# Altium PCB Fliptris_PCB.PcbDoc
Units mil, origin at the board's own origin, x right, y up, seen from the top; angles counter-clockwise.
Board outline 3170 x 3915 mil, 2 copper layers (Top Layer, Bottom Layer); 53 components, 58 nets, 228 pads, 41 vias.
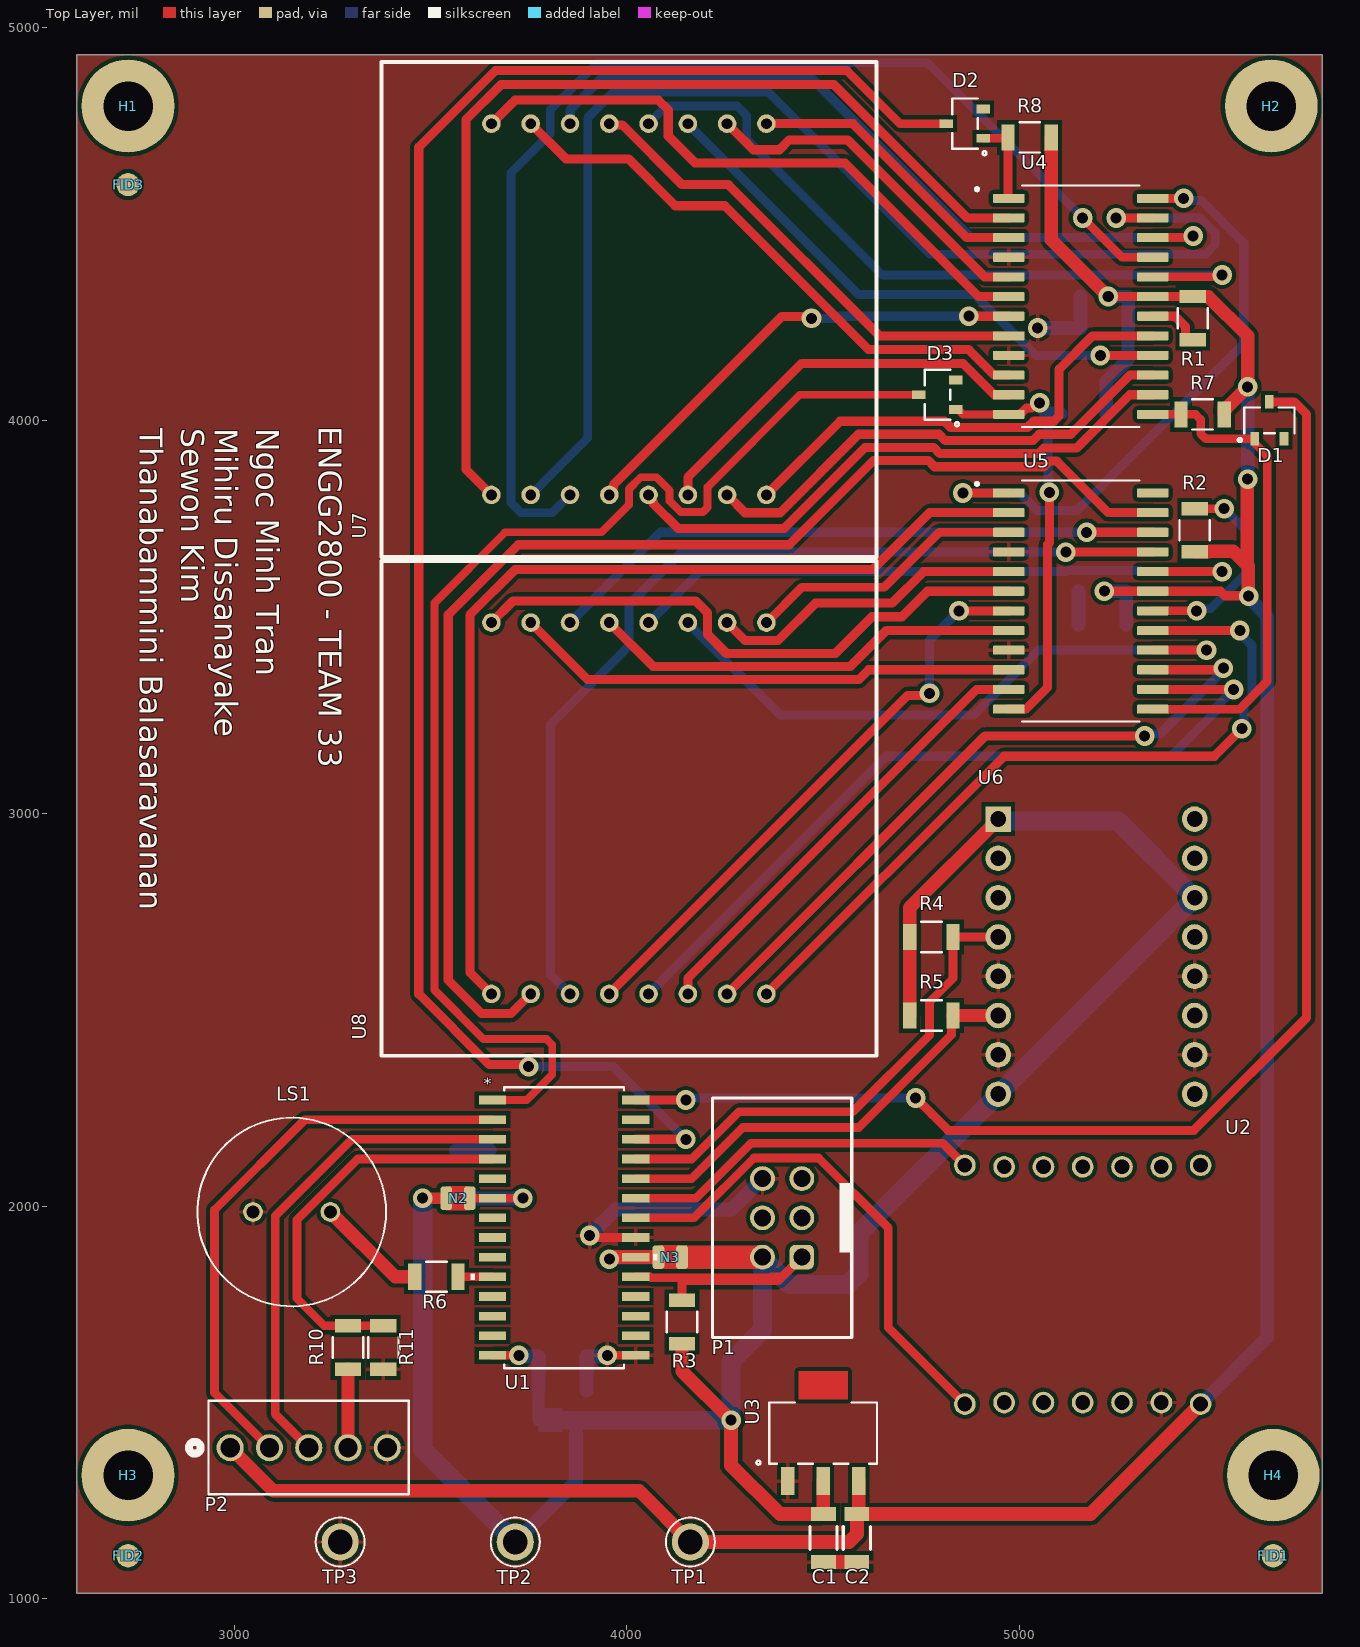
[diagram p0: Top Layer view]
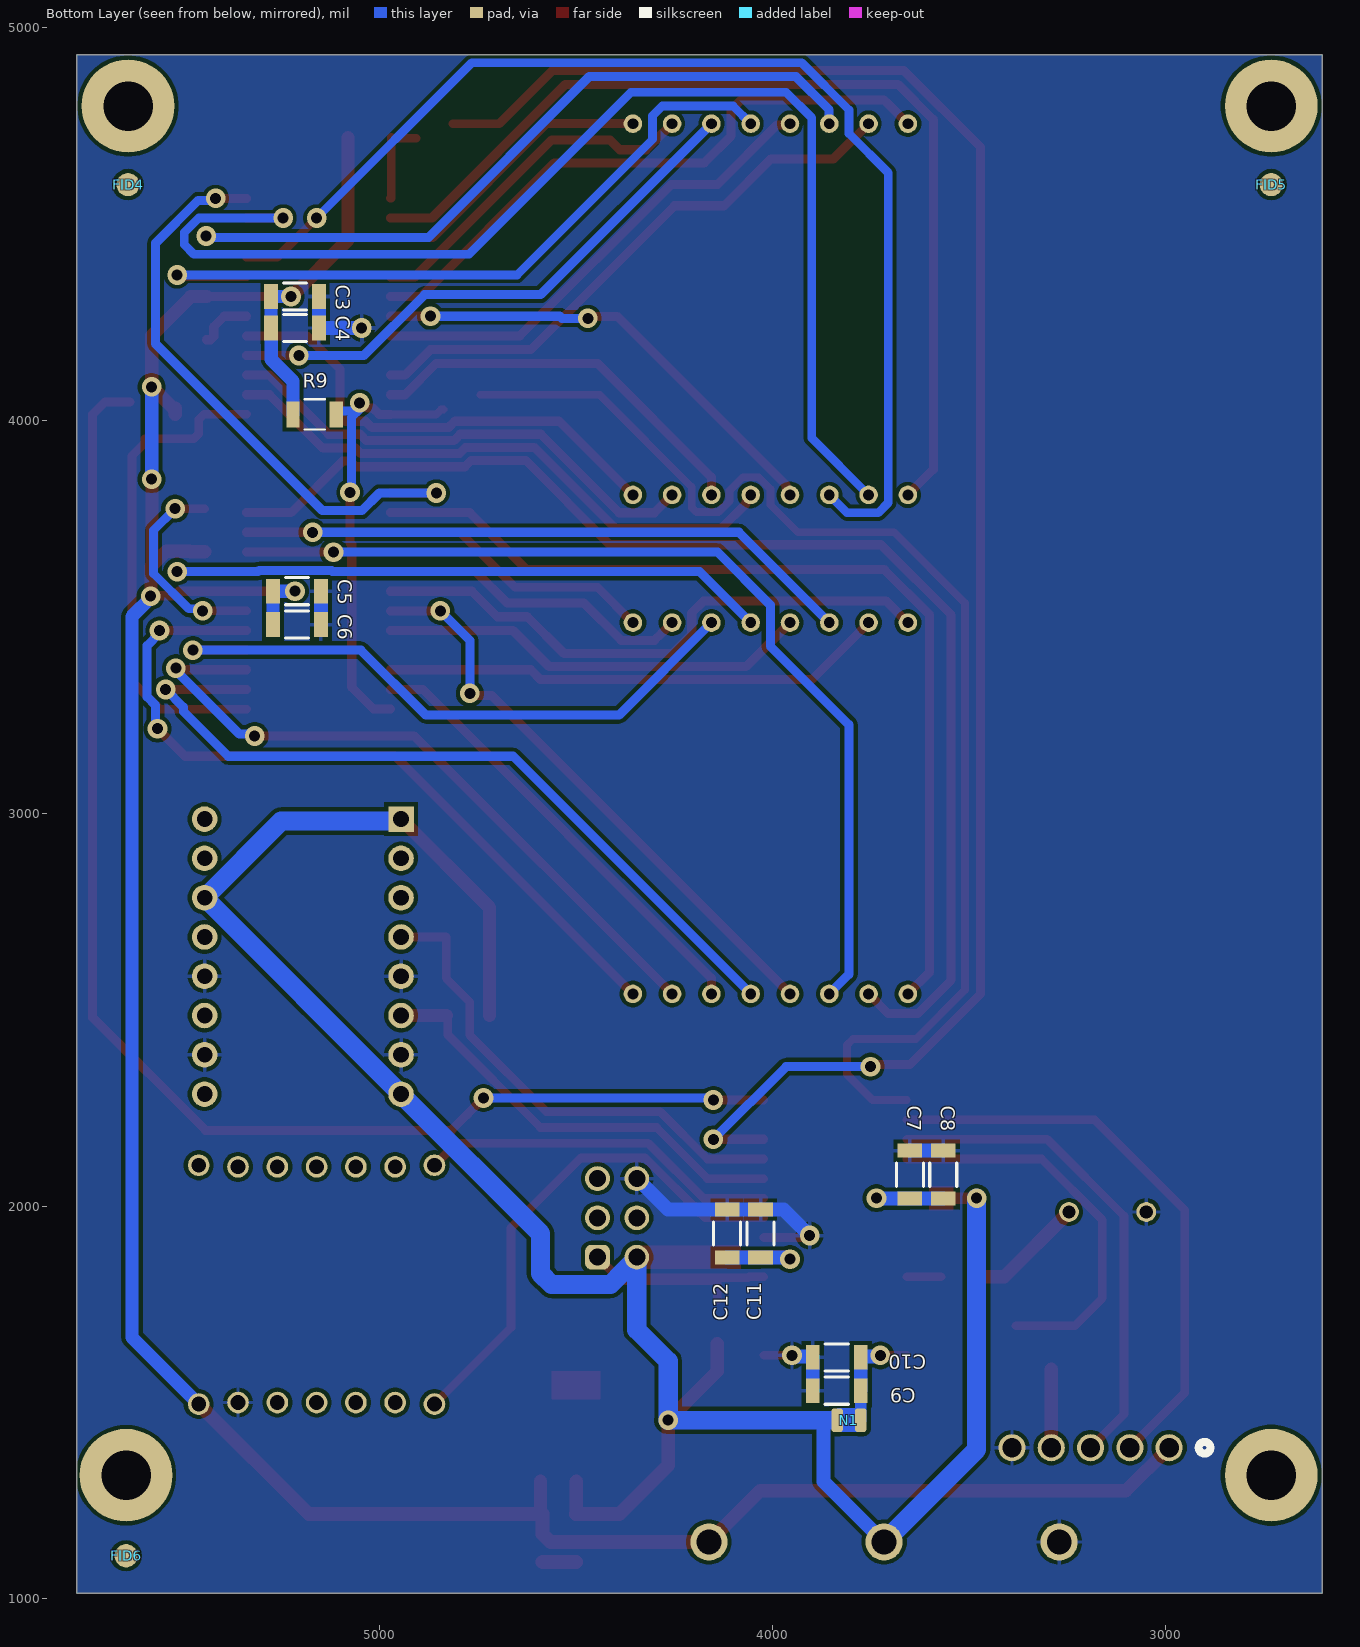
[diagram p1: Bottom Layer view, seen from below]
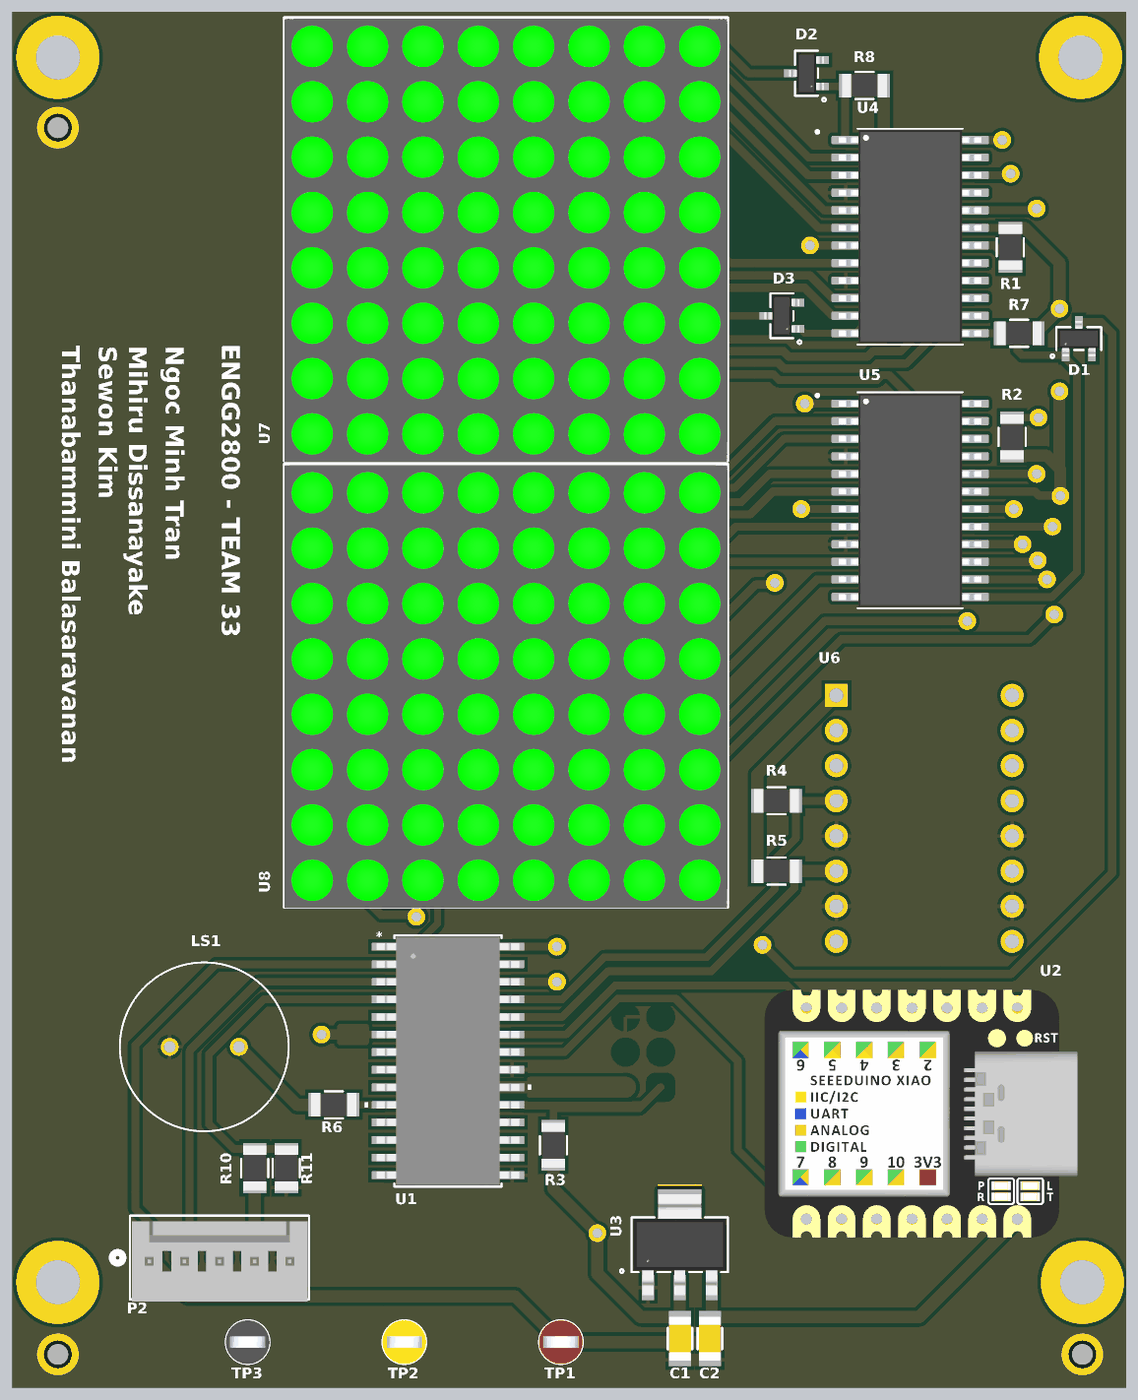
[diagram p2: 3D render of the assembled board from above, using the file's embedded part models]
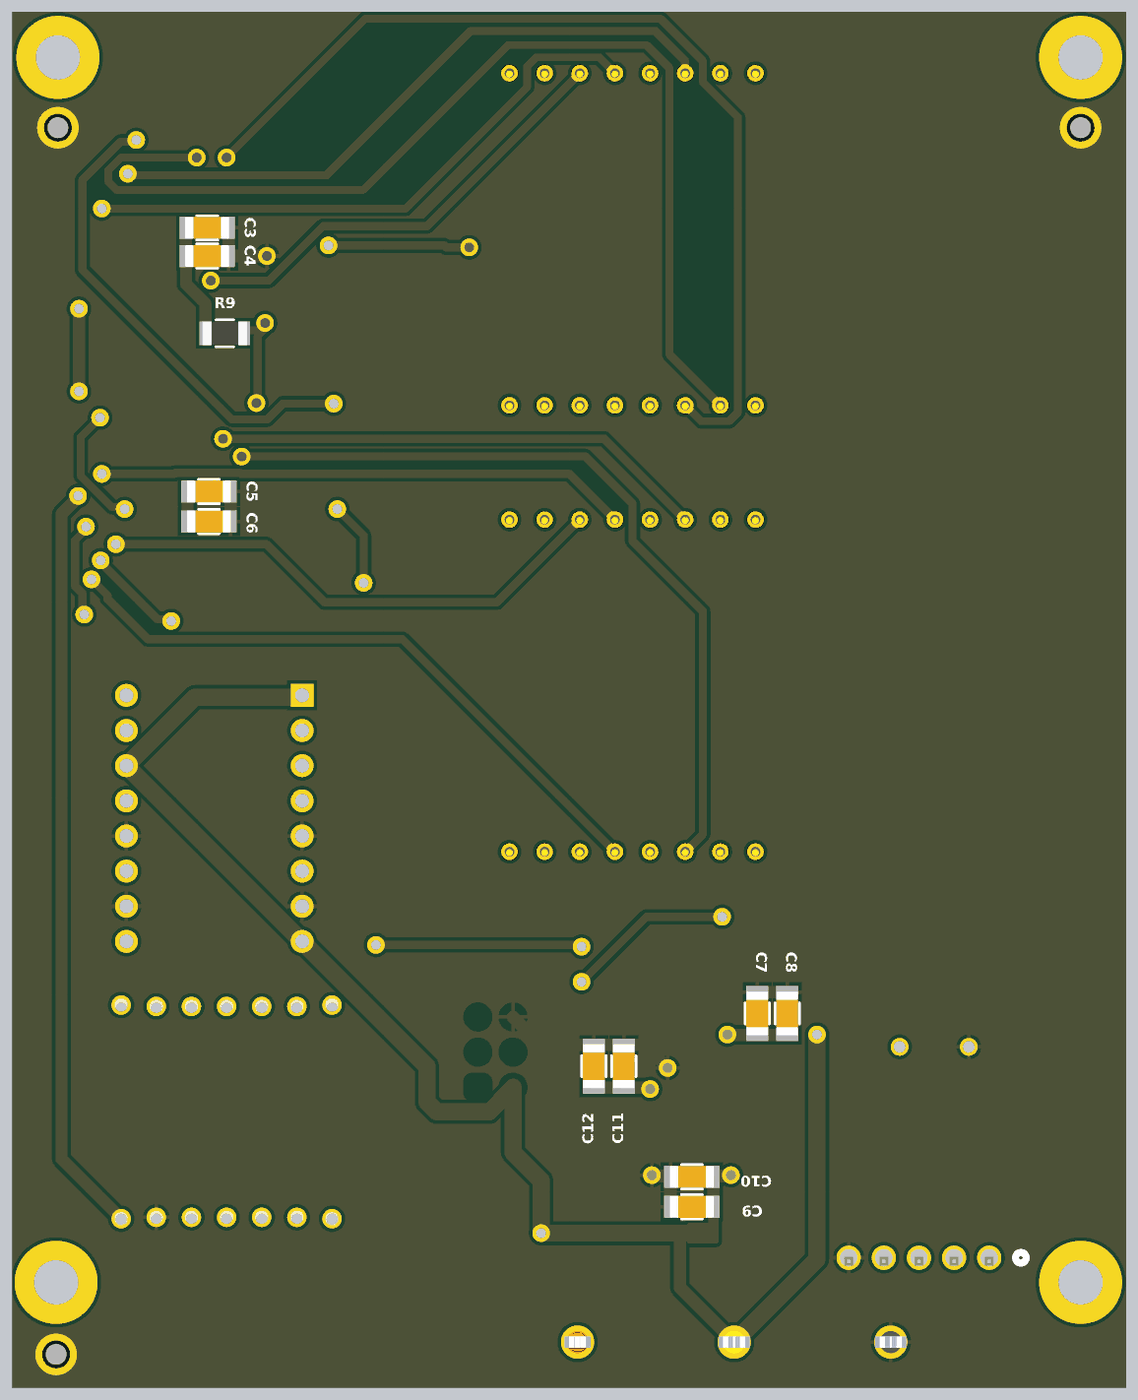
[diagram p3: 3D render of the assembled board from below, using the file's embedded part models]

## Layer stack, top to bottom
Top Solder: solder mask 0.4, Solder Resist, Dk 3.5
Top Layer: signal copper 1.4
Dielectric 1: dielectric 12.6, FR-4, Dk 4.8
Bottom Layer: signal copper 1.4
Bottom Solder: solder mask 0.4, Solder Resist, Dk 3.5

## Board outline
2600,1015 2600,4930 5770,4930 5770,1015

## Design rules (kind name [scope] priority, off if disabled: settings)
Clearance [All] p1: gap=10 ignorepadtopadclearanceinfootprint=FALSE
ComponentClearance [Name = 'LS1' vs (Name = 'FID2') OR (Name = 'HW3')] p1: gap=0 collisioncheckmode=3 verticalgap=0 showdistances=FALSE donotcheckwithout3dbody=TRUE
HoleSize [All] p1: absolutevalues=TRUE maxlimit=500 minlimit=1 maxpercent=80.000 minpercent=20.000
HoleToHoleClearance [All] p1: gap=20 allowstackedmicrovias=TRUE
MinimumSolderMaskSliver [All] p1: minsoldermaskwidth=7
PolygonConnect [All] p1: connectstyle=Relief reliefconductorwidth=10 reliefentries=4 polygonreliefangle="90 Angle" airgapwidth=10
RoutingVias [All] p1: holewidth=28 width=50 viastyle="Through Hole" minholewidth=28 minwidth=50 maxholewidth=28 maxwidth=50
SilkToSilkClearance [All] p1: silktosilkclearance=5
SilkToSolderMaskClearance [IsPad] p1: minsilkscreentomaskgap=6 clearancetoexposedcopper=TRUE
SolderMaskExpansion [All] p1: expansion=0 istentingtop=FALSE
SupplyNets "Schematic Supply Nets_2" [InNet('+5')] p1: voltage=0.000
SupplyNets "Schematic Supply Nets_1" [InNet('GND')] p2: voltage=0.000
SupplyNets "Schematic Supply Nets" [InNet('+3.3V')] p3: voltage=0.000
Width [All] p1: maxlimit=1000 minlimit=99999 preferedwidth=20 toplayer_minwidth=0 bottomlayer_minwidth=0 minimp=50.000000 maximp=50.000000 favimp=50.000000
24 further rules are at their usual default settings.

## Components (designator, comment, footprint, x,y, rotation, side; value= is the part's Value field where it differs from the comment)
C1 "25V X7R 10% 1206" WCAP-CSGP_1206_L3.2W1.6H0.8 4500,1155 r270 top value=10uF
C2 "25V X7R 10% 1206" WCAP-CSGP_1206_L3.2W1.6H0.8 4585,1155 r270 top value=10uF
C3 "10V X7R 10% 1206" WCAP-CSGP_1206_L3.2W1.6H0.8 5215,4315 r180 bottom value=0.1uF
C4 "25V X7R 10% 1206" WCAP-CSGP_1206_L3.2W1.6H0.8 5215,4235 r180 bottom value=10uF
C5 "10V X7R 10% 1206" WCAP-CSGP_1206_L3.2W1.6H0.8 5210,3565 r180 bottom value=0.1uF
C6 "25V X7R 10% 1206" WCAP-CSGP_1206_L3.2W1.6H0.8 5210,3480 r180 bottom value=10uF
C7 "10V X7R 10% 1206" WCAP-CSGP_1206_L3.2W1.6H0.8 3650,2080 r90 bottom value=1uF
C8 "10V X7R 10% 1206" WCAP-CSGP_1206_L3.2W1.6H0.8 3565,2080 r90 bottom value=0.1uF
C9 "10V X7R 10% 1206" WCAP-CSGP_1206_L3.2W1.6H0.8 3836.02,1530 r0 bottom value=1uF
C10 "10V X7R 10% 1206" WCAP-CSGP_1206_L3.2W1.6H0.8 3836.02,1615 r0 bottom value=0.1uF
C11 "10V X7R 10% 1206" WCAP-CSGP_1206_L3.2W1.6H0.8 4030,1930 r90 bottom value=1uF
C12 "10V X7R 10% 1206" WCAP-CSGP_1206_L3.2W1.6H0.8 4115,1930 r90 bottom value=0.1uF
D1 "BAT5404E6327HTSA1" SOT23_INF 5635,4000 r0 top
D2 "BAT5404E6327HTSA1" SOT23_INF 4860,4755 r90 top
D3 "BAT5404E6327HTSA1" SOT23_INF 4790,4065 r90 top
FID1 "FIDUCIAL" FIDUCIAL_1.5MM 5645,1110 r90 top
FID2 "FIDUCIAL" FIDUCIAL_1.5MM 2730,1110 r90 top
FID3 "FIDUCIAL" FIDUCIAL_1.5MM 2730,4600 r90 top
FID4 "FIDUCIAL" FIDUCIAL_1.5MM 5640,4600 r90 bottom
FID5 "FIDUCIAL" FIDUCIAL_1.5MM 2730,4600 r90 bottom
FID6 "FIDUCIAL" FIDUCIAL_1.5MM 5645,1110 r90 bottom
H1 "M3_HOLE" M3_MOUNTING_HOLE 2730,4800 r0 top
H2 "M3_HOLE" M3_MOUNTING_HOLE 5640,4800 r0 top
H3 "M3_HOLE" M3_MOUNTING_HOLE 2730,1315 r0 top
H4 "M3_HOLE" M3_MOUNTING_HOLE 5645,1315 r0 top
LS1 "PS1240P02BT" XDCR_PS1240P02BT 3146.57,1985 r180 top
N1 "NET_TIE" NET_TIE 3835,1455 r180 bottom net-tie
N2 "NET_TIE" NET_TIE 3540,2020 r0 top net-tie
N3 "NET_TIE" NET_TIE 4140,1870 r180 top net-tie
P1 "61200621621" 61200621621 -45605,51970 r90 top
P2 "22272051" CONN_AE-6410-05A_MOL 2990,1385 r180 top
R1 "1% 1/4W 1206" "Universal resistor SMD" 5440,4260 r90 top value=22K
R2 "1% 1/4W 1206" "Universal resistor SMD" 5445,3720 r270 top value=22K
R3 "1% 1/4W 1206" "UNIVERSAL RESISTOR SMD" 4140,1705 r90 top value=1K
R4 "1% 1/4W 1206" "Universal resistor SMD" 4775,2685 r0 top value=4.7K
R5 "1% 1/4W 1206" "Universal resistor SMD" 4775,2485 r0 top value=4.7K
R6 "1% 1/4W 1206" "Universal resistor SMD" 3515,1820 r0 top value=330R
R7 "1% 1/4W 1206" "Universal resistor SMD" 5465,4015 r180 top value=10K
R8 "1% 1/4W 1206" "Universal resistor SMD" 5025,4720 r180 top value=10K
R9 "1% 1/4W 1206" "Universal resistor SMD" 5165,4015 r180 bottom value=10K
R10 "1% 1/4W 1206" "Universal resistor SMD" 3290,1640 r90 top value=4.7K
R11 "1% 1/4W 1206" "Universal resistor SMD" 3380,1640 r90 top value=10K
TP1 "5010" TP_5010 4161.37,1145 r0 top
TP2 "5014" TP_5014 3715.68,1145 r0 top
TP3 "5011" TP_5011 3270,1145 r0 top
U1 "AVR128DB28-I/SO" SOIC28_SO_MCH 3840,1945 r0 top
U2 "XIAO SAMD21" XIAO-14P-ADD-ON 5160,1800 r0 top value=XIAO-Add-On
U3 "LM1117MPX-33NOPB" SOT223-318H_OSI 4499.45,1422 r0 top
U4 "MAX7219CWG+T" SOIC127P1032X265-24N 5155,4290 r0 top
U5 "MAX7219CWG+T" SOIC127P1032X265-24N 5155,3540 r0 top
U6 "LIS3DH" LIS3DH 4945,2985 r0 top
U7 "8x8LED_MATRIX" 8x8LED_MATRIX 4355,4755 r180 top
U8 "8x8LED_MATRIX" 8x8LED_MATRIX 4355,3485 r180 top

## Footprints (in the part's own frame and the unit in brackets; to place one, negate y for a bottom-side part, rotate by r counter-clockwise, add the part's x,y. Pads: shape width x height; smd on the part's side, far side on the other; paste and mask are expansions set on the pad)
8x8LED_MATRIX [mil]
  round 47.2 hole 27.6 paste-99999 mask+2: 1(0,0) 2(100,0) 3(200,0) 4(300,0) 5(400,0) 6(500,0) 7(600,0) 8(700,0) 9(700,944.9) 10(600,944.9) 11(500,944.9) 12(400,944.9) 13(300,944.9) 14(200,944.9) 15(100,944.9) 16(0,944.9)
  silkscreen extent -280,-157 980,1102, body extent -280,-155 980,1105, height 277
61200621621 [mm] "6 pins, straight, gold plating"
  rrect50% 1.6x1.6 hole 1.1: 1(-1272.54,-1271.27)
  round 1.6 hole 1.1: 2(-1272.54,-1268.73) 3(-1270,-1271.27) 4(-1270,-1268.73) 5(-1267.46,-1271.27) 6(-1267.46,-1268.73)
  silkscreen extent -1277.74,-1274.5 -1262.26,-1265.5, body extent -1277.64,-1274.43 -1262.36,-1265.25, height 9.13
CONN_AE-6410-05A_MOL [mil]
  round 69 / inner round 60 / far side round 69 hole 49 paste-99999 mask+0: 1(0,0) 2(-100,0) 3(-200,0) 4(-300,0) 5(-400,0)
  silkscreen extent -455,-120 105,118, body extent -450,-103 50,125, height 463
FIDUCIAL_1.5MM [mm]
  round 1.5 smd paste+0 mask+0.75: 2(0,0)
LIS3DH [mil]
  rect 65x65 hole 40: 1(0,0)
  round 65 hole 40: 2(0,-100) 3(0,-200) 4(0,-300) 5(0,-400) 6(0,-500) 7(0,-600) 8(0,-700) 9(500,-700) 10(500,-600) 11(500,-500) 12(500,-400) 13(500,-300) 14(500,-200) 15(500,-100) 16(500,0)
  body extent -56,-747 550,61, height 63
M3_MOUNTING_HOLE [mm]
  round 6 hole 3.2: 1(0,0)
NET_TIE [mil]
  rrect50% 30x60 smd paste-30 mask+0: N1(0,0) N2(60,0)
  Top Layer region: 0,30 60,30 60,-30 0,-30
SOIC28_SO_MCH [mil]
  rect 69.5x22 smd paste+0 mask+0: 1(-182.25,325) 2(-182.25,275) 3(-182.25,225) 4(-182.25,175) 5(-182.25,125) 6(-182.25,75) 7(-182.25,25) 8(-182.25,-25) 9(-182.25,-75) 10(-182.25,-125) 11(-182.25,-175) 12(-182.25,-225) 13(-182.25,-275) 14(-182.25,-325) 15(182.25,-325) 16(182.25,-275) 17(182.25,-225) 18(182.25,-175) 19(182.25,-125) 20(182.25,-75) 21(182.25,-25) 22(182.25,25) 23(182.25,75) 24(182.25,125) 25(182.25,175) 26(182.25,225) 27(182.25,275) 28(182.25,325)
  silkscreen extent -237,-358 237,358, body extent -203,-353 203,353, height 104
SOIC127P1032X265-24N [mm]
  rrect25% 2.05x0.59 smd: 1(-4.655,6.985) 2(-4.655,5.715) 3(-4.655,4.445) 4(-4.655,3.175) 5(-4.655,1.905) 6(-4.655,0.635) 7(-4.655,-0.635) 8(-4.655,-1.905) 9(-4.655,-3.175) 10(-4.655,-4.445) 11(-4.655,-5.715) 12(-4.655,-6.985) 13(4.655,-6.985) 14(4.655,-5.715) 15(4.655,-4.445) 16(4.655,-3.175) 17(4.655,-1.905) 18(4.655,-0.635) 19(4.655,0.635) 20(4.655,1.905) 21(4.655,3.175) 22(4.655,4.445) 23(4.655,5.715) 24(4.655,6.985)
  silkscreen extent -6.8,-7.8 3.8,7.8, body extent -5.16,-7.7 5.16,7.7, height 2.65
SOT23_INF [mil]
  rect 22x34 smd paste+0 mask+0: 1(-37.5,-47) 2(37.5,-47) 3(0,47)
  silkscreen extent -80,-55 64,32, body extent -59,-50 59,50, height 43
SOT223-318H_OSI [mil]
  rect 34x71 smd paste+0 mask+0: 1(-90.55,-122) 2(0,-122) 3(90.55,-122)
  Top Layer region: 62,86.5 62,157.5 -62,157.5 -62,86.5
  silkscreen extent -170,-80 137,78, body extent -132,-144 132,144, height 71
TP_5010 [mm]
  round 2.4 hole 1.6: TP(0,0)
  silkscreen extent -1.59,-1.58 1.59,1.58, body extent -1.59,-1.59 1.59,1.59, height 8.13
TP_5011 [mm]
  round 2.4 hole 1.6: TP(0,0)
  silkscreen extent -1.59,-1.58 1.59,1.58, body extent -1.59,-1.59 1.59,1.59, height 8.13
TP_5014 [mm]
  round 2.4 hole 1.6: TP(0,0)
  silkscreen extent -1.59,-1.58 1.59,1.58, body extent -1.59,-1.59 1.59,1.59, height 8.13
"Universal resistor SMD" [mil]
  rect 34x67 smd paste+0 mask+0: 1(-55,0) 2(55,0)
  silkscreen extent -26,-38 26,38, body extent -64,-34 64,34, height 26
"UNIVERSAL RESISTOR SMD" [mil]
  rect 34x67 smd paste+0 mask+0: 1(-55,0) 2(55,0)
  silkscreen extent -26,-38 26,38, body extent -64,-34 64,34, height 26
WCAP-CSGP_1206_L3.2W1.6H0.8 [mm] "Ceramic Capacitors, body 3.2x1.6mm"
  rect 0.9x1.6 smd: 1(-1.55,0) 2(1.55,0)
  silkscreen extent -0.75,-0.87 0.75,0.87, body extent -1.6,-0.8 1.6,0.8, height 0.8
XDCR_PS1240P02BT [mm]
  round 1.28 hole 0.85: 1(-2.5,0) 2(2.5,0)
  silkscreen extent -6.1,-6.1 6.1,6.1
XIAO-14P-ADD-ON [mm]
  round 1.4 hole 0.95: 1(7.62,7.72) 2(5.08,7.62) 3(2.54,7.62) 4(0,7.62) 5(-2.54,7.62) 6(-5.08,7.62) 7(-7.62,7.72) 8(-7.62,-7.72) 9(-5.08,-7.62) 10(-2.54,-7.62) 11(0,-7.62) 12(2.54,-7.62) 13(5.08,-7.62) 14(7.62,-7.72)
  body extent -10.65,-9.08 11.95,8.82, height 4.5

## Part data
C1 C2 C4 C6: library part CMP-03913-65419883-2, "Cap Ceramic uF 10V X7R 10% Pad SMD 1206", Case/Package=1206
C3 C5 C8 C10 C12: library part CMP-03913-65419883-2, "Cap Ceramic 0.1uF 10V X7R 10% Pad SMD 1206", Case/Package=1206, Manufacturer="Würth Elektronik", Manufacturer Product Number=885012208009
C7 C9 C11: library part CMP-03913-65419883-2, "Cap Ceramic 1uF 10V X7R 10% Pad SMD 1206", Case/Package=1206, Manufacturer="Würth Elektronik", Manufacturer Product Number=885012208013
D1 D2 D3: "Silicon Schottky Diode", Manufacturer_Name=Infineon, Copyright="Copyright (C) 2025 Ultra Librarian. All rights reserved.", Manufacturer_Part_Number=BAT5404E6327HTSA1, RefDes=RefDes, Type="Diodes - Rectifiers, Arrays"
LS1: "Buzzers Transducer, Externally Driven Piezo 3V 4kHz 60dB @ 3V, 10cm Through Hole PC Pins", Package="2020 TDK", Availability=Unavailable, MF=TDK, MP=PS1240P02BT, Price=None, SnapEDA_Link=https://www.snapeda.com/parts/PS1240P02BT/TDK/view-part/53420/?ref=snap
P1: library part CMP-1502-00000-3, "Conn Shrouded Header (4 Sides) M 6 POS 2.54mm Solder ST Top Entry Thru-Hole Tray", Color=Black, Contact Resistance=20mΩ, Current Rating=3A, Insulation Resistance=1GΩ, Max Operating Temperature=105°C, Min Operating Temperature=-40°C, Operating Supply Voltage=250V, Connector Type="Male Pin", Contact Material=Copper, Contact Plating=Gold, Gender=Male, Insulation Material=PBT, Lead Pitch=2.54mm, Length=15.28mm, Mount="Through Hole", Number of Contacts=6, Number of Pins=6, Number of Positions=6, Number of Rows=2, Orientation=Vertical, Pitch=2.54mm, RoHS=Compliant, Row Spacing=2.54mm, Termination=Solder
P2: "KK 254 Wire-to-Board Header, Vertical, with Friction Lock, 5 Circuits, Tin (Sn) Plating", Manufacturer_Name="Molex Connector Corporation", Copyright="Copyright (C) 2025 Ultra Librarian. All rights reserved.", Manufacturer_Part_Number=22272051, RefDes=RefDes, Type=Type
R1 R2 R3 R4 R5 R6 R7 R8 R9 R10 R11: library part "Universal resistor SMD", "Resistor SMD 1206", Case/Package=1206
TP1: "Test Point MultiPurpose THM .445 L .125 OD Heat Resistant Nylon 46 Red", Package="NON STANDARD-1 Keystone", Check_prices=https://www.snapeda.com/parts/5010/Keystone/view-part/?ref=eda, MF="Keystone Electronics", MP=5010, SnapEDA_Link=https://www.snapeda.com/parts/5010/Keystone/view-part/?ref=snap
TP2: "Test Point MultiPurpose THM H .445 Nylon 46 Insulated Yel PhosBronze/Silver", Package=None, Check_prices=https://www.snapeda.com/parts/5014/Keystone/view-part/?ref=eda, MF=Keystone, MP=5014, SnapEDA_Link=https://www.snapeda.com/parts/5014/Keystone/view-part/?ref=snap
TP3: "Test Point MultiPurpose THM H .445 Nylon 46 Insulated Blk PhosBronze/Silver", Package=None, Check_prices=https://www.snapeda.com/parts/5011/Keystone/view-part/?ref=eda, MF="Keystone Electronics Corp.", MP=5011, SnapEDA_Link=https://www.snapeda.com/parts/5011/Keystone/view-part/?ref=snap
U1: library part AVR128DB28-ISO, "No Description Available", Manufacturer_Name=Microchip, Copyright="Copyright (C) 2026 Ultra Librarian. All rights reserved.", Manufacturer_Part_Number=AVR128DB28-I/SO, RefDes=RefDes, Type=Type
U2: library part XIAO-Add-On
U3: "Description", Manufacturer_Name=onsemi, Copyright="Copyright (C) 2025 Ultra Librarian. All rights reserved.", Manufacturer_Part_Number=LM1117MPX-33NOPB, RefDes=RefDes, Type=Type
U4 U5: "LED Driver 64 Segment 330000uA Supply Current 24-Pin SOIC W T/R", Package=None, Check_prices=https://www.snapeda.com/parts/MAX7219CWG+T/Maxim+Integrated/view-part/?ref=eda, MF="Maxim Integrated Products", MP=MAX7219CWG+T, SnapEDA_Link=https://www.snapeda.com/parts/MAX7219CWG+T/Maxim+Integrated/view-part/?ref=snap

## Via types
v1: diameter 50, hole 28, Top Layer to Bottom Layer, 41 vias

## Nets (pads, with @x,y where several pads share a name; then routed paths per layer and width w, separated by ;. In a path a pad name is that pad's centre, name@x,y a point inside that pad or via, vN(x,y) a via of type N, cw(c..) or ccw(c..) an arc to the next point about the centre after c; other vN are vias at no path point)
5V_CLK: D1.1 R7.2 U4.13 U5.13 | length 1258
  Top Layer w22: U5.13 5559.4,3265 5630,3335.6 5630,3910 5597.5,3942.5 D1.1 5472.89,3953 5460,3965.89 5460,4002.11 5447.11,4015 R7.2 U4.13
5V_LOAD: D3.1 R9.2 U4.12 U5.12 | length 1155.3
  Top Layer w20: D3.1 4843,4027.5 4855.5,4015 U4.12
  Top Layer w23.23: U5.12 5015,3265 5070.5,3320.5 5070.5,3683.74 5075,3688.24 v1(5075,3816.61) ; U4.12 5000.47,4015 5016.47,4031 5029.79,4031 5043.17,4044.39 v1(5050.42,4044.39)
  Bottom Layer w23.23: v1(5050.42,4044.39) v1@5050.42,4028.46 ; v1(5075,3816.61) 5071.39,3820.23 5071.39,4007.49 v1@5050.42,4028.46 ; R9.2 5110,4017.96 5104.61,4023.34 5055.54,4023.34 v1@5050.42,4028.46
5V_MOSI: D2.1 R8.2 U4.1 | length 220.4
  Top Layer w22: D2.1 4967.5,4717.5 R8.2 4970,4565.61 4970.61,4565 U4.1
+3.3V: C1.1 N1.N1 N2.N1 N3.N1 P1.2 R3.1 R4.1 R5.1 TP2.TP U3.2 U6.1 U6.8 U6.14 | length 5983.2
  Top Layer w30: v1(3480,2020) N2.N1
  Top Layer w34: R3.1 4140,1580 v1(4265,1455) ; C1.1@4499.45,1216.57 U3.2 ; R5.1 R4.1 4720,2760 U6.1@4947.35,2987.35
  Top Layer w35.43: v1(4265,1455) 4265,1340 4388.98,1216.02 4498.9,1216.02 C1.1@4499.45,1216.57
  Top Layer w60: N3.N1 P1.2
  Bottom Layer w35.43: TP2.TP 3870,1299.32 3870,1455
  Bottom Layer w48: N1.N1@3844,1455 3870,1455 v1(4265,1455)
  Bottom Layer w48.82: v1(3480,2020) 3480,1380.68 TP2.TP ; v1(4265,1455) 4265,1605 4345,1685 P1.2@4345,1866.16 ; P1.2 4345,1868.41 4379.09,1834.32 4379.09,1833.48 4412.57,1800 4561.4,1800 4590,1828.6 4590,1930 U6.8 U6.14 5250,2980 U6.1@4945,2980
+5: C2.1 C3.1 C4.1 C5.1 C6.1 P2.1 R1.2 R2.2 R7.1 R8.1 R9.1 TP1.TP U2.14 U3.3 U4.19 U5.19 | length 7644.9
  Top Layer w23.22: v1(5225,4315) U4.19
  Top Layer w23.23: v1(5215,3565) U5.19 5510.44,3565 5522.05,3553.39 v1@5581.61,3553.39 ; U4.19 R1.2
  Top Layer w34: P2.1@2980.22,1394.78 P2.1 3100,1275 4031.37,1275 TP1.TP ; C2.1@4590,1216.74 U3.3 ; R8.1 5080,4460 v1(5225,4315) ; R1.2 5480,4315 5580,4215 v1(5580,4085) 5526.5,4031.5 5520,4031.5 R7.1 ; R2.2 5481.46,3665 5483.46,3667 5543,3667 5578.84,3631.16 ; v1(5580,3850) 5578.84,3848.84 5578.84,3631.16 ; v1(5582.53,3552.47) 5581.61,3553.39 5581.53,3553.47 5581.53,3628.47 5578.84,3631.16
  Top Layer w35.43: TP1.TP 4565.08,1145 4585,1164.92 C2.1@4585,1211.74 ; C2.1 5179.96,1216.02 U2.14
  Bottom Layer w34: v1(5215,3565) C5.1 C6.1 ; R9.1 5220,4099.5 5275.31,4154.81 5275.31,4234.28 C4.1 C3.1 v1(5225,4315) ; U2.14 5630,1666.06 5630,3500.67 5582.53,3548.14 v1(5582.53,3552.47) ; v1(5580,3850) v1(5580,4085)
AVDD: C9.1 C10.1 N1.N2 U1.14 | length 280.8
  Top Layer w22: U1.14 v1(3725,1620)
  Bottom Layer w30: N1.N2 C9.1
  Bottom Layer w35.43: v1(3725,1620) 3727.5,1617.5 3775,1617.5 C10.1 C9.1
Buzzer: R6.2 U1.10 | length 87.8
  Top Layer w22: R6.2 U1.10
CAS_MAT: U4.24 U5.1 | length 1561.4
  Top Layer w23.23: v1(4855,3815) U5.1 ; U4.24 v1(5417.04,4565)
  Bottom Layer w23.23: v1(4855,3815) 5000,3815 5045,3770 5145,3770 5570,4195 5570,4451.12 5461.25,4559.88 5422.16,4559.88 v1(5417.04,4565)
COL1_M1: U4.14 U7.13 | length 1478.5
  Top Layer w23.23: U7.13 4055,3803.61 4066.99,3791.63 4066.99,3788.01 4130,3725 4400,3725 4606.11,3931.11 4780.55,3931.11 4796.55,3915.11 5046.95,3915.11 5061.03,3929.19 5144.19,3929.19 5280,4065 U4.14
COL1_M2: U5.14 U8.13 | length 2022.5
  Top Layer w23.23: U5.14 v1(5544.34,3315)
  Bottom Layer w23.23: U8.13 4659.9,3145 5384.73,3145 5499.01,3259.28 5499.01,3269.67 v1(5544.34,3315)
COL2_M1: U4.16 U7.3 | length 1427.7
  Top Layer w23.33: v1(5205,4165) U4.16
  Bottom Layer w23.33: U7.3 4590,4320 4885,4320 5040,4165 v1(5205,4165)
COL2_M2: U5.16 U8.3 | length 1622.4
  Top Layer w23.23: U5.16 v1(5475,3415)
  Bottom Layer w23.23: U8.3 4390,3250 4882.24,3250 5047.24,3415 v1(5475,3415)
COL3_M1: U4.20 U7.4 | length 1870.7
  Top Layer w22: U4.20 5338.88,4365.61 5510.61,4365.61 v1(5515,4370)
  Bottom Layer w22: U7.4 4100,4800 4280,4800 4305,4775 4305,4715 4650,4370 v1(5515,4370)
COL3_M2: U5.20 U8.4 | length 1693
  Top Layer w23.23: U5.20 v1(5514.95,3615)
  Bottom Layer w23.23: U8.4 4185,3615 5119.2,3615 5122.31,3618.11 5305.91,3618.11 5309.02,3615 v1(5514.95,3615)
COL4_M1: U4.23 U7.10 | length 3215.7
  Top Layer w22: v1(5245,4515) U4.23
  Bottom Layer w22: U7.10 3900,3955.1 3900,4770 3965,4835 4360,4835 4772,4423 5472.4,4423 5497,4447.6 5497,4478 5460,4515 v1(5245,4515)
COL4_M2: U5.23 U8.10 | length 3218.7
  Top Layer w23.23: U8.10 3754.78,2540.1 3704.68,2490 3630,2490 3545,2575 3545,3505 3723.36,3683.36 4413.36,3683.36 4627.88,3897.88 4766.79,3897.88 4782.79,3881.88 5060.71,3881.88 5074.79,3895.96 5094.04,3895.96 5225,3765 U5.23
COL5_M1: U4.22 U7.6 | length 1932
  Top Layer w23.23: U4.22 5436.95,4465 v1(5440.95,4469)
  Bottom Layer w23.23: U7.6 3855.6,4755.6 3855.6,4790.6 3940,4875 4465.59,4875 4875.59,4465 5436.95,4465 v1(5440.95,4469)
COL5_M2: U5.22 U8.6 | length 1578.5
  Top Layer w23.23: v1(5170,3715) U5.22
  Bottom Layer w23.23: U8.6 4085,3715 v1(5170,3715)
COL6_M1: U4.21 U7.11 | length 3008.5
  Top Layer w22: v1(5160,4515) 5260,4415 U4.21
  Bottom Layer w22: U7.11 3809.9,3765 3730,3765 3705,3790 3705,4630 3805,4730 3805,4790 3925,4910 4765,4910 v1(5160,4515)
COL6_M2: U5.21 U8.11 | length 2483.1
  Top Layer w23.23: v1(5117.12,3664.43) 5117.68,3665 U5.21
  Bottom Layer w23.23: U8.11 3805,2590.1 3805,3225 4005,3425 4005,3530 4140,3665 5116.55,3665 v1(5117.12,3664.43)
COL7_M1: U4.15 U7.15 | length 1260.3
  Top Layer w23.33: U7.15 4300.27,3764.84 4389.84,3764.84 4589.39,3964.39 4794.33,3964.39 4810.33,3948.39 5033.17,3948.39 5049.17,3964.39 5129.39,3964.39 5280,4115 U4.15
COL7_M2: U5.15 U8.15 | length 1791.3
  Top Layer w23.23: U8.15 4911.41,3196.51 v1(5317.54,3196.51) ; U5.15 5514.13,3365 v1(5518.08,3368.95)
  Bottom Layer w23.23: v1(5317.54,3196.51) 5322.66,3201.63 5356.63,3201.63 5518.08,3363.08 v1(5518.08,3368.95)
COL8_M1: U4.17 U7.16 | length 1233.7
  Top Layer w23.33: U7.16 4542.62,3997.72 4808.14,3997.72 4824.14,3981.72 5019.36,3981.72 5035.36,3997.72 5086.33,3997.72 5100,4011.39 5100,4130 5185,4215 U4.17
COL8_M2: U5.17 U8.16 | length 1985.1
  Top Layer w23.23: U8.16 4959.9,3145 5495,3145 v1(5565,3215) ; U5.17 v1(5560,3465)
  Bottom Layer w23.23: v1(5560,3465) 5560,3457.76 5591.29,3426.47 5591.29,3296.02 5570.11,3274.84 5570.11,3220.11 v1(5565,3215)
GND: C1.2 C2.2 C3.2 C4.2 C5.2 C6.2 C7.2 C8.2 C9.2 C10.2 C11.2 C12.2 LS1.2 P1.6 P2.5 R11.1 TP3.TP U1.15 U1.21 U2.13 U3.1 U4.4 U4.9 U5.4 U5.9 U6.5 U6.7 U6.10 U6.12 | length 1274.3
  Top Layer w22: v1(3905,1925) 3910,1920 U1.21 ; v1(3950,1620) U1.15
  Top Layer w35.43: C1.2 C2.2
  Bottom Layer w35.43: C8.2 C7.2 ; C9.2 C10.2 ; C10.2@3897.05,1617.5 3947.5,1617.5 v1(3950,1620) ; v1(3905,1925) 3971.02,1991.02 C12.2 4266.02,1991.02 P1.6 ; v1(5045.33,4235.11) 5045.39,4235.05 5153.98,4235.05 C4.2 C3.2 ; C6.2 C5.2
I2C_SCL: R4.2 U1.25 U6.4 | length 1268.1
  Top Layer w22: U1.25 4165.05,2120 4285.05,2240 4575,2240 4770,2435 4770,2519.54 4830,2579.54 R4.2 U6.4
I2C_SDA: R5.2 U1.24 U6.6 | length 1119.3
  Top Layer w22: U1.24 4165,2070 4295,2200 4590,2200 4825.92,2435.92 R5.2@4825.92,2485
  Top Layer w34: R5.2 U6.6
MCU_CLK: D1.3 U1.28 | length 3506.2
  Top Layer w23.23: U1.28 v1(4150,2270) ; v1(4735,2275) 4776.54,2233.46 4817.39,2192.61 5442.61,2192.61 5730,2480 5730,4015 5698,4047 D1.3
  Bottom Layer w23.23: v1(4150,2270) 4155,2275 v1(4735,2275)
MCU_LOAD: D3.3 U1.1 | length 3192.3
  Top Layer w20: U1.1 3745,2270 3810,2335 3810,2410 3795,2425 3635,2425 3510,2550 3510,3535 3689.97,3714.97 3934.97,3714.97 4005,3785 4005,3825 4035,3855 4075,3855 4108.6,3821.4 4108.6,3794.84 4136.94,3766.5 4193.28,3766.5 4205,3778.22 4205,3830 4440,4065 D3.3
MCU_MOSI: D2.3 U1.26 | length 4595.7
  Top Layer w22: 4560,4890 4695,4755 D2.3
  Top Layer w23.23: v1(3750,2355) 3744.88,2360.12 3649.88,2360.12 3470,2540 3470,4695 3665,4890 4560,4890 ; U1.26 v1(4150,2170)
  Bottom Layer w23.23: v1(3750,2355) 3965,2355 v1(4150,2170)
MCU_RX: U1.23 U2.7 | length 919
  Top Layer w22: U1.23 4175.5,2020 4315.5,2160 4803.94,2160 U2.7
MCU_TX: U1.22 U2.8 | length 1309.1
  Top Layer w22: U1.22 4170.76,1970 4323.26,2122.5 4487.5,2122.5 4665,1945 4665,1691.06 U2.8
NetLS1_1: LS1.1 R6.1 | length 283.3
  Top Layer w34: LS1.1 3410,1820 R6.1
NetP2_4: P2.4 R10.1 | length 200
  Top Layer w34: P2.4 R10.1
NetR1_1: R1.1 U4.18 | length 141.3
  Top Layer w23.23: U4.18 5395,4265 5421.8,4238.2 5421.8,4213.14 5429.95,4205 R1.1
NetR2_1: R2.1 U5.18 | length 538.9
  Top Layer w22: U5.18 v1(5450,3515) ; R2.1 v1(5520,3775)
  Bottom Layer w22: v1(5450,3515) 5455.36,3520.36 5485.36,3520.36 5575,3610 5575,3720 v1(5520,3775)
ROW1_M1: U4.2 U7.9 | length 2541.4
  Top Layer w23.23: U7.9 3590,3875.1 3590,4765 3679.67,4854.67 4526.66,4854.67 4866.33,4515 U4.2
ROW1_M2: U5.2 U8.9 | length 2467.1
  Top Layer w23.23: U8.9 3655,2540.32 3600,2595.32 3600,3505 3715,3620 4625,3620 4770,3765 U5.2
ROW2_M1: U4.11 U7.14 | length 1014.9
  Top Layer w23.23: U7.14 4155,3855 4445,4145 4855,4145 4935,4065 U4.11
ROW2_M2: U5.11 U8.14 | length 1161.1
  Top Layer w23.23: U8.14 4155,2580 4890,3315 U5.11
ROW3_M1: U4.6 U7.8 | length 1587.6
  Top Layer w23.23: U7.8 3655.22,4755 3705.22,4805 3705.38,4805 3715.38,4815 4080,4815 4105,4790 4105,4723.61 4173.28,4655.33 4554.67,4655.33 4895,4315 U4.6
ROW3_M2: U5.6 U8.8 | length 1492.6
  Top Layer w23.23: U8.8 3710,3540 4175,3540 4205,3510 4205,3455 4253.44,3406.56 4530.33,3406.56 4623.77,3500 4700,3500 4765,3565 U5.6
ROW4_M1: U4.7 U7.12 | length 1218.1
  Top Layer w23.23: U7.12 3955,3816.59 3965.65,3827.23 3965.65,3835.65 4394.58,4264.58 4464.5,4264.58 v1(4469.54,4259.54) ; v1(4870,4265) U4.7
  Bottom Layer w23.23: v1(4469.54,4259.54) 4535.53,4259.54 4541,4265 v1(4870,4265)
ROW4_M2: U5.7 U8.12 | length 1499.6
  Top Layer w23.23: U8.12 4714.78,3299.88 4764.88,3299.88 v1(4770,3305) ; v1(4845,3515) U5.7
  Bottom Layer w23.23: v1(4770,3305) 4770,3440 v1(4845,3515)
ROW5_M1: U4.3 U7.1 | length 736.9
  Top Layer w23.23: U7.1 4575,4755 4865,4465 U4.3
ROW5_M2: U5.3 U8.1 | length 712
  Top Layer w22: U8.1 4445,3575 4655,3575 4795,3715 U5.3
ROW6_M1: U4.10 U7.7 | length 1481.8
  Top Layer w23.23: U7.7 3845,4665 4004.05,4665 4122.89,4546.16 4248.84,4546.16 4615,4180 4870,4180 4935,4115 U4.10
ROW6_M2: U5.10 U8.7 | length 1287.1
  Top Layer w23.23: U8.7 3900,3340 4590,3340 4615,3365 U5.10
ROW7_M1: U4.5 U7.2 | length 899.2
  Top Layer w23.23: U7.2 4296.21,4713.79 4296.59,4713.79 4321.82,4688.56 4388.18,4688.56 4413.41,4713.79 4561.21,4713.79 4910,4365 U4.5
ROW7_M2: U5.5 U8.2 | length 808
  Top Layer w23.23: U8.2 4281.5,3458.5 4300.21,3439.79 4384.79,3439.79 4480,3535 4675,3535 4755,3615 U5.5
ROW8_M1: U4.8 U7.5 | length 1240.4
  Top Layer w23.23: U7.5 3958.1,4751.9 3988.1,4751.9 4140,4600 4257.88,4600 4642.88,4215 U4.8
ROW8_M2: U5.8 U8.5 | length 1101
  Top Layer w23.23: U8.5 4066.67,3373.33 4568.33,3373.33 4660,3465 U5.8
SNES_CLK: P2.2 U1.2 | length 1466
  Top Layer w22: P2.2 2950,1525 2950,1990 3180,2220 U1.2
SNES_DATA: R10.2 R11.2 U1.4 | length 1011.1
  Top Layer w22: R11.2 3230,1695 3160,1765 3160,1965.33 3314.67,2120 U1.4
SNES_LATCH: P2.3 U1.3 | length 1258.7
  Top Layer w22: P2.3 3105,1470 3105,1975 3300,2170 U1.3
UPDI: P1.1 R3.2 U1.19 | length 754.7
  Top Layer w22: U1.19 4059.7,1820 4062.19,1817.5 4366.74,1817.5 4369.24,1820 4395,1820 ; R3.2 4140,1810 4148.7,1810 4159.31,1810 4321.76,1810 4369.24,1810 4385,1810 4395,1820 ; P1.1 4395,1820
VDD: C11.1 C12.1 N3.N2 U1.20 | length 288.7
  Top Layer w35.43: v1(3955,1865) 3960,1870 U1.20 N3.N2
  Bottom Layer w35.43: v1(3955,1865) 3958.94,1865 3962.92,1868.98 C11.1 C12.1
VDDIO2: C7.1 C8.1 N2.N2 U1.6 | length 305.4
  Top Layer w22: N2.N2 v1(3735,2020)
  Bottom Layer w35.43: C8.1 C7.1 3733.98,2018.98 v1(3735,2020)
pads on no net: D1.2 D2.2 D3.2 FID1.2 FID2.2 FID3.2 FID4.2 FID5.2 FID6.2 H1.1 H2.1 H3.1 H4.1 P1.3 P1.4 P1.5 U1.5 U1.7 U1.8 U1.9 U1.11 U1.12 U1.13 U1.16 U1.17 U1.18 U1.27 U2.1 U2.2 U2.3 U2.4 U2.5 U2.6 U2.9 U2.10 U2.11 U2.12 U5.24 U6.2 U6.3 U6.9 U6.11 U6.13 U6.15 U6.16

## Polygon pours and split planes (outlines as drawn)
GND on Top Layer "Top_layer_GND" (solid, remove dead copper, pour order 0): 2600,4930 2600,1015 5770,1015 5770,4930
GND on Bottom Layer "Top_layer_GND" (solid, remove dead copper, pour order 1): 2600,4930 2600,1015 5770,1015 5770,4930

## Silkscreen, mask and mechanical layers (free items; w line width, h text height)
Top Overlay:
  text "ENGG2800 - TEAM 33" at 3196.39,3985 h100 r270
  text "Thanabammini Balasaravanan" at 2741.2,3980 h100 r270
  text "Sewon Kim" at 2846.39,3980 h100 r270
  text "Mihiru Dissanayake" at 2931.65,3980 h100 r270
  text "Ngoc Minh Tran" at 3037.11,3980 h100 r270

## Text inside footprints (layer, text, board x,y; h text height)
U1: Top Overlay "*" at 3635.25,2287 h50; Top 3D Body "*" at 3695,2244.5 h50